# Altium PCB B-60-30-B.PcbDoc (part 3 of 3)
Units mm, origin at the board's own origin, x right, y up, seen from the top; angles counter-clockwise.
Board outline 70.1 x 39.1 mm, 6 copper layers (Top Layer, G1, S1, S2, G2, Bottom Layer), stack 2.011 mm thick; 241 components, 129 nets, 632 pads, 875 vias.
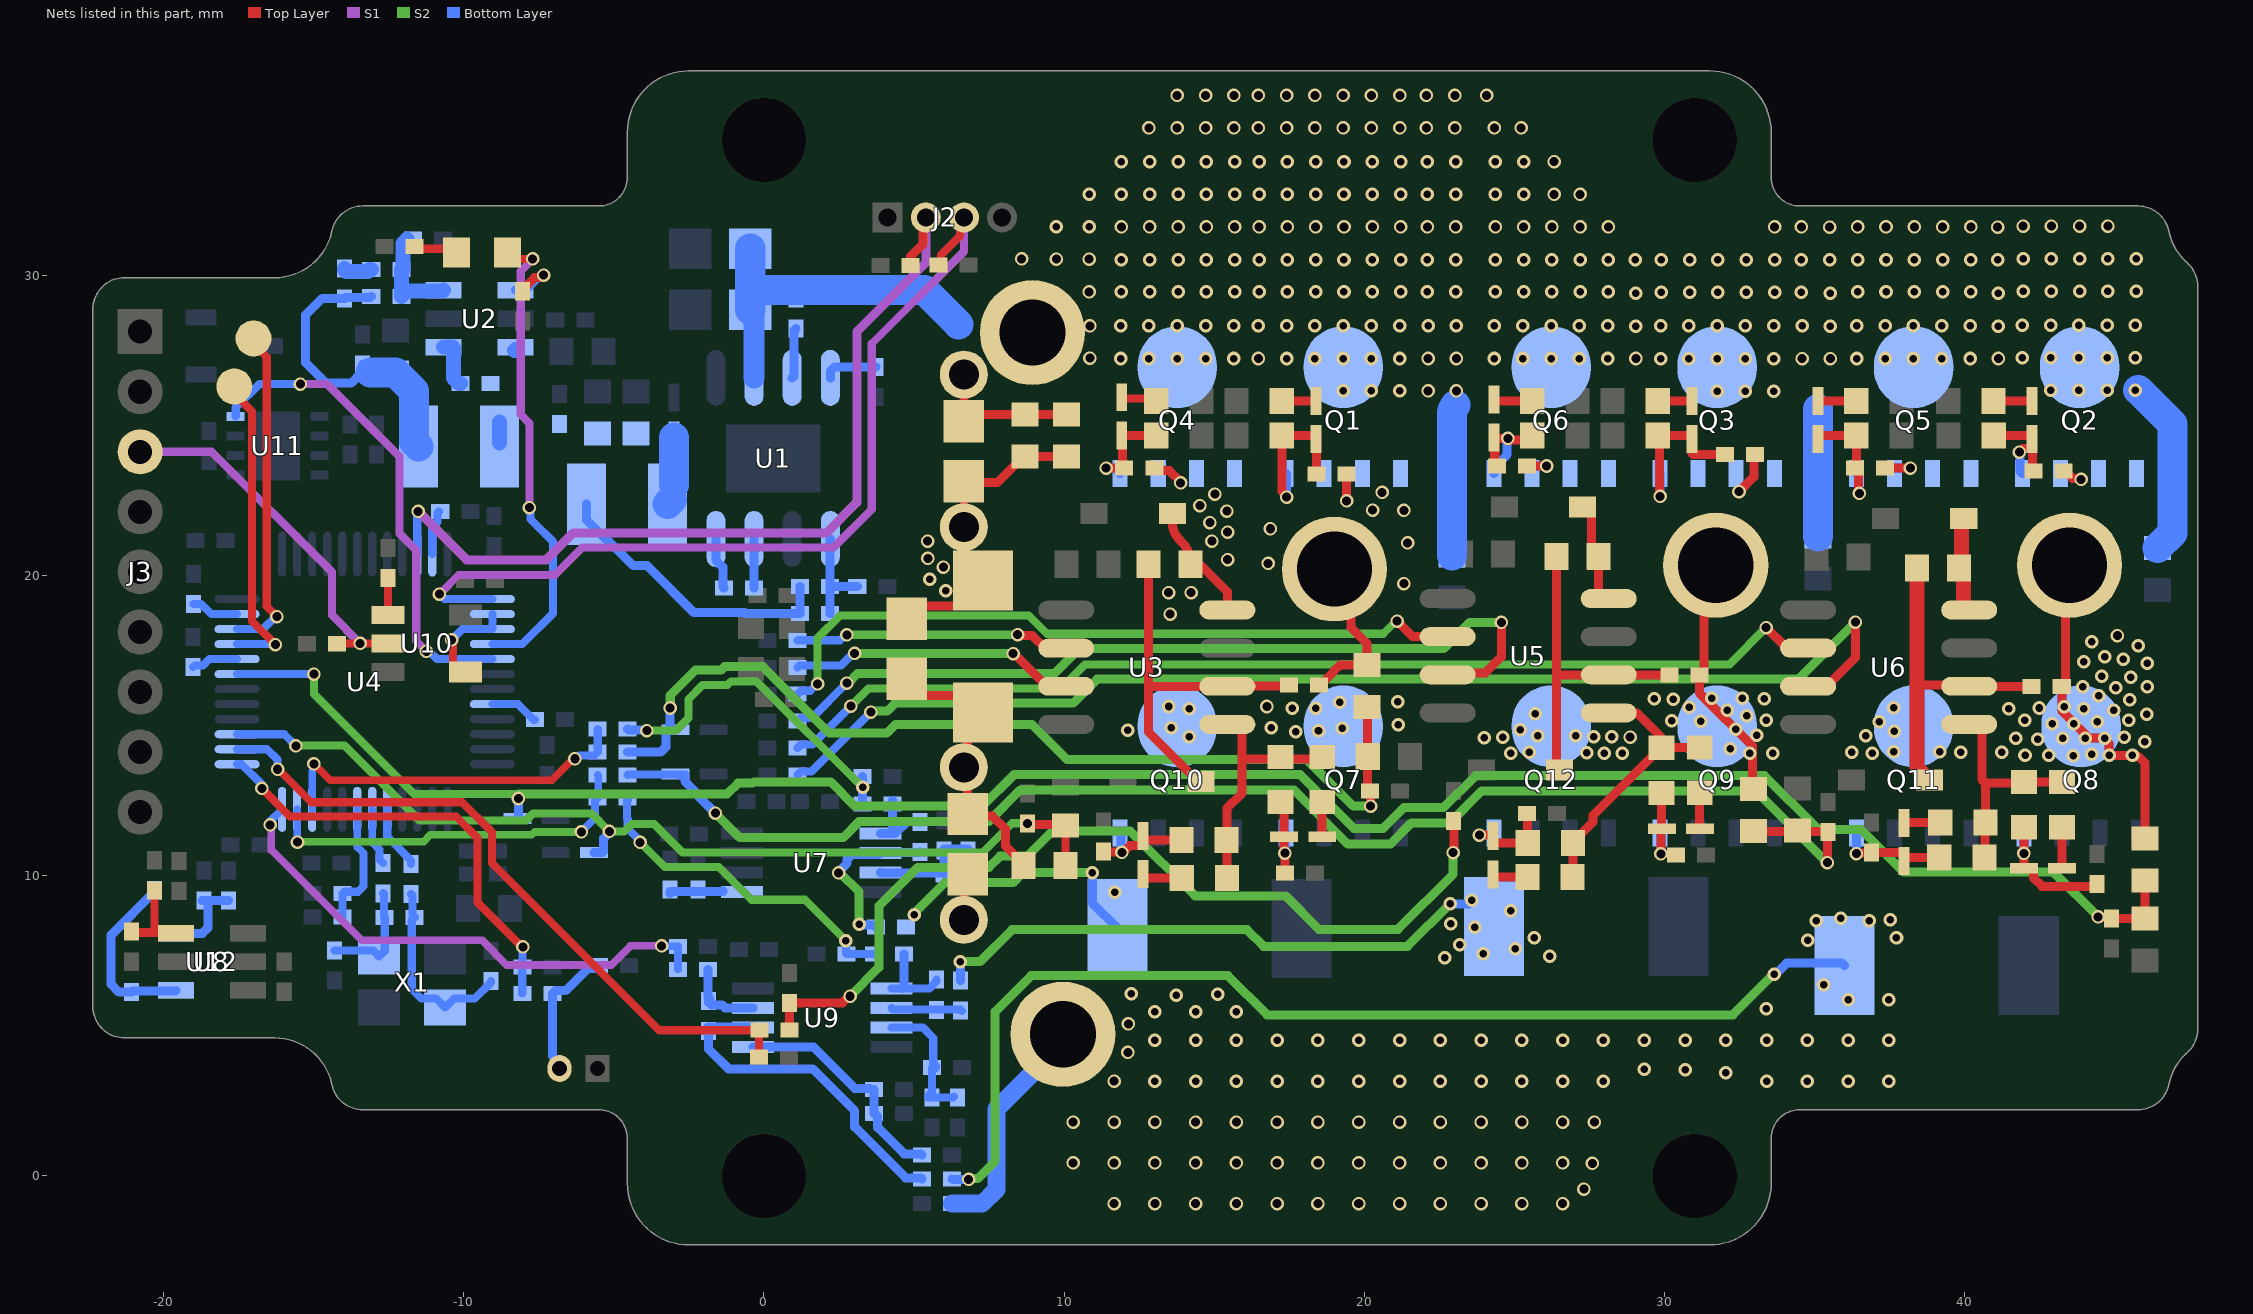
[diagram p6: the nets of this part, all layers, seen from the top]

## Via types
v1: diameter 0.45, hole 0.3, Top Layer to Bottom Layer, 450 vias
v2: diameter 0.45, hole 0.25, Top Layer to Bottom Layer, 425 vias

## Nets (pads, with @x,y where several pads share a name; then routed paths per layer and width w, separated by ;. In a path a pad name is that pad's centre, name@x,y a point inside that pad or via, vN(x,y) a via of type N, cw(c..) or ccw(c..) an arc to the next point about the centre after c; other vN are vias at no path point) (continued)
IA: C50.2 R12.2 R71.2 | length 11.2
  S2 w0.27: v1(-3.9,14.83) -2.929,14.83 -2.514,15.245 -2.514,15.872 -2.041,16.345 -1.22,16.345 -1.101,16.464 -0.244,16.464 3.281,12.939 v2(3.29,12.939)
  Bottom Layer w0.3: R12.2@-4.536,14.874 -4.514,14.852 -3.922,14.852 v1(-3.9,14.83) ; R71.2@3.28,12.5 3.28,12.87 3.29,12.88 v2(3.29,12.939) ; v2@3.285,12.905 C50.2@3.285,13.295
IB: C61.2 R18.2 R90.1 | length 11.2
  S2 w0.27: v1(-4.12,11.106) -3.304,10.29 -1.505,10.29 -0.41,9.195 1.365,9.195 v2(2.73,7.83)
  Bottom Layer w0.27: R18.2@-4.536,12.588 -4.536,12.495 -4.558,12.473 -4.558,11.897 -4.536,11.875 -4.536,11.571 -4.12,11.155 v1(-4.12,11.106) ; v2(2.73,7.83) 2.73,7.404 C61.2@2.753,7.381 R90.1@3.658,7.381
IC: C60.2 R89.2 U4.12 | length 17.7
  S1 w0.254: v1(-16.45,11.69) -16.412,11.653 -16.412,10.853 -13.4,7.84 -9.38,7.84 -8.56,7.02 -5.083,7.02 -4.442,7.661 v1(-3.41,7.661)
  Bottom Layer w0.254: v1(-16.45,11.69) -16.45,11.802 U4.12@-16.045,12.207 ; v1(-3.41,7.661) -3.397,7.648 -2.874,7.648 C60.2@-2.861,7.635 R89.2@-2.861,6.873
LA: R31.1 R37.1 R41.1 R45.1 U3.5 | length 8.3
  Top Layer w0.3: R45.1@15.41,11.191 15.415,11.187 15.415,9.925 R41.1@15.419,9.921 R41.1@15.429,9.911 ; R45.1@15.419,11.36 15.419,12.24 15.927,12.748 15.927,13.882 ; U3.5@15.434,15.034 15.927,15.034 15.927,13.882 ; R31.1@18.594,13.882 17.197,13.882 15.927,13.882
LB: R34.1 R40.1 R44.1 R47.1 U5.5 | length 9.3
  Top Layer w0.3: R44.1@26.933,9.95 26.938,9.955 26.938,11.075 R47.1@26.943,11.08 26.943,11.109 27.61,11.775 27.61,11.997 29.868,14.255 R40.1@29.897,14.255 ; U5.5@28.134,15.415 29.065,15.415 29.897,14.583 R40.1@29.897,14.255 ; R34.1@31.167,14.263 31.163,14.259 29.901,14.259 R40.1@29.897,14.255
LC: R32.1 R38.1 R42.1 R46.1 U6.5 | length 7.1
  Top Layer w0.3: U6.5@40.453,15.034 40.565,14.923 40.565,13.195 40.683,13.077 ; R46.1@40.653,10.6 40.668,10.615 40.668,11.755 R42.1@40.683,11.77 40.683,12.947 40.683,13.077 ; R32.1@43.232,13.112 R38.1@41.962,13.112 41.927,13.077 40.683,13.077
LED: LED1.2 U4.40 | length 15.8
  Top Layer w0.27: LED1.2@-8.535,30.749 -8.326,30.54 v1(-7.7,30.54)
  S1 w0.27: v1(-7.81,22.25) -7.81,25.06 -8.1,25.35 -8.1,30.14 v1(-7.7,30.54)
  Bottom Layer w0.27: U4.40@-9.045,17.707 -8.048,17.707 -7.026,18.729 -7.026,21.124 -7.665,21.763 -7.776,21.874 -7.776,22.216 v1(-7.81,22.25)
NetC1_1: C1.1 D2.2 L2.1 U1.8 | length 3.5
  Bottom Layer w0.3: U1.8@-1.599,21.209 -1.599,20.502 -1.37,20.273 -1.37,19.606 C1.1@-1.337,19.573
  Bottom Layer w1: L2.1@-3.217,22.367 L2.1@-3.067,22.517 ; L2.1@-2.996,23 D2.2@-2.996,24.59
NetC1_2: C1.2 U1.7 | length 1.6
  Bottom Layer w0.3: C1.2@-0.337,19.573 -0.333,19.577 -0.333,21.205 U1.7@-0.329,21.209
NetC6_1: C6.1 C15.1 L1.2 R1.1 R3.1 | length 10.3
  Bottom Layer w0.3: R1.1@-13.37,26.97 R1.1@-13.37,27.02 ; -13.1,26.75 -13.367,26.747 -13.403,26.747 -13.75,26.4 -14.58,26.4 -15.269,27.089 -15.269,28.661 -14.71,29.22 R3.1@-13.97,29.22 -13.936,29.254 -13.112,29.254 C15.1@-13.078,29.288
  Bottom Layer w1: -13.1,26.75 C6.1@-12.267,26.747 -11.65,26.13 -11.65,24.44 L1.2@-11.5,24.29
NetC13_1: C13.1 L1.1 U2.6 | length 0.7
  Bottom Layer w0.5: L1.1@-8.805,24.399 L1.1@-8.805,25.109 ; U2.6@-8.302,27.488 -8.276,27.513 U2.6@-8.273,27.513
NetC13_2: C13.2 U2.1 | length 1.6
  Bottom Layer w0.5: U2.1@-10.67,27.6 -10.37,27.6 -10.345,27.575 -10.345,26.575 -10.16,26.39 C13.2@-10.11,26.39
NetC15_2: C15.2 R7.2 R10.1 U2.3 | length 3.5
  Bottom Layer w0.5: R10.1@-11.881,31.193 -12.028,31.046 -12.028,30.177 R7.2@-12.078,30.177 C15.2@-12.078,29.288 -11.891,29.475 -10.695,29.475 U2.3@-10.67,29.5
NetC16_1: C16.1 C17.1 C18.1 L2.2 R4.2 R8.2 | length 9.8
  Bottom Layer w0.3: L2.2@-5.917,22.367 -5.917,21.854 -5.22,21.157 -5.187,21.157 -4.35,20.32 -3.89,20.32 -2.329,18.759 -0.655,18.759 -0.621,18.725 R8.2@1.203,18.725 C18.1@1.203,19.62
NetC18_2: C18.2 R8.1 R11.2 U1.5 | length 3.4
  Bottom Layer w0.3: R8.1@2.203,18.725 C18.2@2.203,19.62 ; U1.5@2.211,21.209 2.207,21.205 2.207,19.624 C18.2@2.203,19.62 ; R11.2@3.108,19.62 C18.2@2.203,19.62
NetC23_1: C23.1 D3.2 U3.8 | length 4.6
  Top Layer w0.3: D3.2@13.6,22.05 13.6,21.755 ccw(c14.385,21.755) 13.83,21.2 13.897,21.133 cw(c13.133,20.368) C23.1@14.214,20.368 14.512,20.368 15.434,19.446 U3.8@15.434,18.844 U3.8@14.906,18.844
NetC23_2: C23.2 D7.2 R19.2 U3.6 | length 12.5
  Top Layer w0.3: C23.2@12.814,20.368 12.814,16.33 ; D7.2@14.56,13.129 14.46,13.129 12.814,14.775 12.814,16.33 ; R19.2@17.324,16.312 17.32,16.308 15.438,16.308 U3.6@15.434,16.304 12.84,16.304 12.814,16.33
NetC28_1: C28.1 U4.23 | length 1.6
  Bottom Layer w0.27: C28.1@-19,19.05 -18.75,19.05 -18.407,18.707 U4.23@-17.545,18.707
NetC29_1: C29.1 U4.35 | length 1.5
  Bottom Layer w0.27: U4.35@-11.036,20.716 U4.35@-11.045,20.707 -11.045,21.595 -10.87,21.77 -10.87,22.08 C29.1@-10.82,22.13
NetC37_1: C37.1 D11.2 U5.8 | length 3.6
  Top Layer w0.3: D11.2@27.26,22.273 27.36,22.273 27.56,22.073 27.56,20.865 C37.1@27.803,20.622 27.803,19.377 27.955,19.225 U5.8@28.134,19.225
NetC37_2: C37.2 D15.2 R36.2 U5.6 | length 10.9
  Top Layer w0.3: C37.2@26.403,20.622 26.403,16.68 ; D15.2@26.498,13.51 26.403,13.605 26.403,16.68 ; R36.2@30.159,16.685 26.408,16.685 26.403,16.68
NetC38_2: C38.2 R43.2 R48.1 X1.1 | length 6.6
  Bottom Layer w0.27: R43.2@-11.75,9.39 -11.704,9.344 -11.704,8.684 R48.1@-11.63,8.61 -11.73,8.51 -11.73,6.218 -11.412,5.9 -10.913,5.9 X1.1@-10.616,5.603 -10.315,5.904 -9.63,5.904 -9.092,6.442 C38.2@-9.092,6.492
NetC39_2: C39.2 R49.2 U4.7 | length 4.2
  Bottom Layer w0.254: U4.7@-13.545,12.207 -13.545,10.952 -13.33,10.737 -13.33,10.696
  Bottom Layer w0.27: C39.2@-14.042,8.625 R49.2@-14.042,9.398 -13.979,9.46 -13.52,9.46 -13.33,9.65 -13.33,10.696
NetC41_2: C41.2 R48.2 R51.2 X1.3 | length 3.8
  Bottom Layer w0.27: C41.2@-14.299,7.5 -13.013,7.5 X1.3@-12.816,7.303 -12.63,7.489 R48.2@-12.63,8.61 -12.655,8.635 -12.655,9.385 R51.2@-12.68,9.41
NetC42_1: C42.1 D19.2 U6.8 | length 3.6
  Top Layer w0.5: D19.2@39.96,21.892 39.883,21.815 39.883,20.318 C42.1@39.806,20.241 39.956,20.091 39.956,18.904 40.016,18.844 U6.8@40.453,18.844
NetC42_2: C42.2 D20.2 R53.2 U6.6 | length 11.2
  Top Layer w0.3: 38.406,16.304 38.361,16.349 38.406,16.349 40.408,16.349 40.453,16.304 R53.2@42.224,16.304
  Top Layer w0.5: C42.2@38.406,20.241 38.406,16.349 38.406,16.304 38.406,13.594 38.62,13.38 38.62,13.28 38.72,13.18 D20.2@38.82,13.18
NetC48_2: C48.2 R73.2 R76.2 U7.3 | length 3.8
  Bottom Layer w0.3: U7.3@3.876,10.104 3.898,10.082 5.988,10.082 R73.2@6.005,10.065 ; R73.2@6.01,10.06 R73.2@6.005,10.065 ; R76.2@6.8,10.89 6,10.89 6.005,10.885 R73.2@6.005,10.065
NetC54_1: C54.1 R82.1 U8.3 | length 2.9
  Bottom Layer w0.3: U8.3@-19.588,8.077 -18.706,8.077 -18.515,8.268 C54.1@-18.515,9.167 ; C54.1@-18.715,9.167 R82.1@-17.826,9.167
NetC57_2: C57.2 R92.2 R94.2 U9.5 | length 7.6
  Bottom Layer w0.3: U9.5@-0.357,4.288 1.652,4.288 3.03,2.91 R94.2@3.51,2.91 ; R94.2@3.67,2.88 C57.2@3.67,2.08 3.688,2.08 3.788,1.98 3.788,1.612 4.672,0.728 5.232,0.728 R92.2@5.27,0.69
NetC58_2: C58.2 R93.2 R95.2 U9.3 | length 4.5
  Bottom Layer w0.27: U9.3@4.243,4.938 5.292,4.938 5.64,4.59 5.64,3.64 R93.2@5.625,3.625 ; R93.2@5.6,3.6 5.6,2.79 5.47,2.66 5.47,2.61 6.3,2.61 6.31,2.62 R95.2@6.325,2.635 ; R93.2@5.725,3.6 R93.2@5.725,3.655
NetC62_1: C62.1 R91.1 U8.1 | length 6
  Bottom Layer w0.3: R91.1@-20.3,9.51 -20.3,9.46 -21.74,8.02 -21.74,6.38 -21.48,6.12 -21.056,6.12 C62.1@-21.055,6.119 -21.026,6.148 -19.617,6.148 U8.1@-19.588,6.177
NetC66_1: C66.1 R98.1 U12.1 | length 2.9
  Top Layer w0.27: -20.321,8.106 -20.293,8.134 R98.1@-20.293,9.5
  Top Layer w0.3: C66.1@-21.055,8.135 -21.026,8.106 -20.321,8.106 -19.617,8.106 U12.1@-19.588,8.077
NetD4_1: D4.1 Q1.2 R22.2 R105.2 | length 5.3
  Top Layer w0.3: v1(17.41,22.6) 17.41,22.641 17.248,22.803 R22.2@17.248,24.66 18.361,24.66 18.361,24.6 D4.1@18.421,24.54 ; D4.1@18.391,24.533 18.4,24.524 18.4,23.389 R105.2@18.41,23.38
  Bottom Layer w0.3: Q1.2@17.39,23.383 17.41,23.363 v1(17.41,22.6)
NetD4_2: D4.2 R14.2 | length 1.1
  Top Layer w0.3: R14.2@17.248,25.803 D4.2@18.391,25.803
NetD5_1: D5.1 Q2.2 R23.2 R107.1 | length 3.7
  Top Layer w0.3: R23.2@40.959,24.66 42.199,24.66 42.229,24.63 D5.1@42.229,24.533 42.255,24.508 42.255,24.218 42.255,23.506 R107.1@42.28,23.48 ; v1(41.81,24.1) 41.928,24.218 42.199,24.218 D5.1@42.229,24.248
  Bottom Layer w0.3: v1(41.81,24.1) 41.839,24.071 41.839,23.456 Q2.2@41.911,23.383
NetD5_2: D5.2 R15.2 | length 1.3
  Top Layer w0.3: R15.2@40.95,25.803 D5.2@42.229,25.803
NetD6_1: D6.1 Q3.2 R24.2 R106.1 | length 5.2
  Top Layer w0.3: v1(29.85,22.63) 29.821,22.659 29.821,24.609 R24.2@29.77,24.66 30.883,24.66 30.913,24.63 D6.1@30.913,24.533 ; 30.913,24.05 30.943,24.02 R106.1@32.01,24.02
  Bottom Layer w0.3: Q3.2@29.841,23.383 29.85,23.374 v1(29.85,22.63)
NetD6_2: D6.2 R17.2 | length 1.1
  Top Layer w0.3: R17.2@29.77,25.803 D6.2@30.913,25.803
NetD8_1: D8.1 Q4.2 R28.2 R99.1 | length 3.1
  Top Layer w0.3: v1(11.4,23.57) R99.1@12,23.57 11.944,23.626 11.944,24.39 11.944,24.63 D8.1@11.914,24.66 12.49,24.66 R28.2@13.066,24.66
  Bottom Layer w0.3: Q4.2@11.686,23.56 Q4.2@11.863,23.383
NetD8_2: D8.2 R25.2 | length 1.2
  Top Layer w0.27: D8.2@11.914,25.93 11.959,25.885 12.984,25.885 R25.2@13.066,25.803
NetD9_1: D9.1 Q5.2 R29.2 R100.1 | length 4.1
  Top Layer w0.3: D9.1@35.104,24.533 35.104,24.63 35.134,24.66 R29.2@36.383,24.66 ; R29.2@36.381,24.669 36.381,23.57 36.451,23.5 36.451,22.759 v1(36.48,22.73)
  Bottom Layer w0.3: Q5.2@36.384,23.383 36.451,23.316 36.451,22.759 v1(36.48,22.73)
NetD9_2: D9.2 R26.2 | length 1.3
  Top Layer w0.3: D9.2@35.104,25.803 R26.2@36.383,25.803
NetD10_1: D10.1 Q6.2 R30.2 R101.1 | length 3.6
  Top Layer w0.3: D10.1@24.309,24.673 24.309,24.591 D10.1@24.34,24.56 ; D10.1@24.31,24.59 D10.1@24.34,24.56 ; D10.1@24.34,24.47 24.34,23.71 R101.1@24.41,23.64 ; v1@24.78,24.47 24.809,24.499 25.426,24.499 R30.2@25.588,24.66 ; v1(24.78,24.56) D10.1@24.34,24.56
  Bottom Layer w0.3: Q6.2@24.314,23.383 24.314,23.583 24.751,24.02 24.751,24.441 v1@24.78,24.47
NetD10_2: D10.2 R27.2 | length 1.3
  Top Layer w0.3: D10.2@24.309,25.803 R27.2@25.588,25.803
NetD12_1: D12.1 Q7.2 R37.2 R108.1 | length 3.1
  Top Layer w0.3: R37.2@17.197,12.376 17.321,12.251 D12.1@17.321,11.224 ; D12.1@17.324,11.224 D12.1@17.321,11.224 ; R108.1@17.35,10.08 v1(17.35,10.75) 17.321,10.779 D12.1@17.321,11.224
  Bottom Layer w0.3: v1(17.35,10.75) 17.35,11.461 Q7.2@17.39,11.421
NetD12_2: D12.2 R31.2 | length 1.1
  Top Layer w0.3: D12.2@18.594,11.294 R31.2@18.594,12.376
NetD13_1: D13.1 Q8.2 R38.2 R110.1 | length 4.7
  Top Layer w0.3: 41.96,10.464 v1(41.96,10.74) 41.96,11.603 R38.2@41.962,11.605 ; D13.1@41.965,10.245 42.25,10.245 42.28,10.215 42.28,9.93 42.568,9.642 44.312,9.642 R110.1@44.39,9.72
  Bottom Layer w0.3: v1(41.96,10.74) 41.96,11.419 Q8.2@41.962,11.421
NetD13_2: D13.2 R32.2 | length 1.1
  Top Layer w0.3: 43.232,10.462 R32.2@43.232,11.605
NetD14_1: D14.1 Q9.2 R40.2 R109.1 | length 2.8
  Top Layer w0.3: v1(29.87,10.72) 29.87,11.514 D14.1@29.912,11.556 29.897,11.571 R40.2@29.897,12.748
  Bottom Layer w0.3: Q9.2@29.841,11.421 29.869,11.393 v1(29.87,10.72) v1(29.87,10.72)
NetD14_2: D14.2 R34.2 | length 1.2
  Top Layer w0.3: R34.2@31.167,12.757 31.167,11.571 D14.2@31.182,11.556
NetD16_1: D16.1 Q10.2 R45.2 R104.1 | length 3.6
  Top Layer w0.3: R104.1@11.31,10.8 11.325,10.785 11.906,10.785 v1(11.92,10.77) ; v1@11.905,10.765 11.955,10.765 12.194,11.003 12.595,11.003 12.625,11.033 12.625,11.191 R45.2@13.904,11.191
  Bottom Layer w0.3: Q10.2@11.863,11.421 11.892,11.392 11.892,10.799 v1(11.92,10.77)
NetD16_2: D16.2 R41.2 | length 1.4
  Top Layer w0.3: D16.2@12.625,10.208 12.625,10.111 D16.2@12.655,10.081 ; D16.2@12.655,9.921 R41.2@13.912,9.921
NetD17_1: D17.1 Q11.2 R46.2 R102.1 | length 3.7
  Top Layer w0.3: v1(36.38,10.73) 36.4,10.75 36.96,10.75 36.98,10.77 37.94,10.77 37.97,10.74 D17.1@37.97,10.6 ; D17.1@37.97,10.48 D17.1@37.97,10.6 ; R46.2@39.147,10.6 D17.1@37.97,10.6
  Bottom Layer w0.3: v1(36.38,10.73) 36.382,10.732 36.382,11.419 Q11.2@36.384,11.421
NetD17_2: D17.2 R42.2 | length 1.2
  Top Layer w0.3: D17.2@37.97,11.77 R42.2@39.177,11.77
NetD18_1: D18.1 Q12.2 R47.2 R103.1 | length 3.4
  Top Layer w0.3: v1(23.83,11.35) 24.25,11.35 24.28,11.32 24.28,11.21 24.28,11.11 24.31,11.08 R47.2@25.437,11.08 25.423,11.093 25.423,12.047 R103.1@25.41,12.06
  Bottom Layer w0.3: v1(23.83,11.35) 24.214,11.35 24.314,11.45 Q12.2@24.314,11.472
NetD18_2: D18.2 R44.2 | length 1.2
  Top Layer w0.3: D18.2@24.28,9.94 24.29,9.95 R44.2@25.427,9.95
NetLED1_1: LED1.1 R69.1 | length 1.4
  Top Layer w0.27: R69.1@-11.632,30.876 -10.362,30.876 LED1.1@-10.235,30.749
NetR2_2: R2.2 U2.4 | length 2.1
  Top Layer w0.3: R2.2@-8.04,29.46 -8.04,29.51 -7.639,29.911 -7.468,29.911 -7.409,29.97 -7.368,29.97 v1(-7.339,29.999)
  Bottom Layer w0.3: U2.4@-8.27,29.5 -7.945,29.5 -7.534,29.911 -7.468,29.911 -7.409,29.97 -7.368,29.97 v1(-7.339,29.999)
NetR3_2: R3.2 R7.1 | length 1
  Bottom Layer w0.5: R3.2@-13.97,30.22 -13.97,30.17 -13.917,30.117 -13.188,30.117 -13.128,30.177 R7.1@-13.078,30.177
NetR5_2: R5.2 U1.3 | length 1.7
  Bottom Layer w0.3: U1.3@0.941,26.574 1.004,26.637 1.004,28.153 R5.2@1.068,28.217
NetR6_2: R6.2 U1.4 | length 1.8
  Bottom Layer w0.3: U1.4@2.211,26.574 2.211,26.788 2.363,26.94 R6.2@3.74,26.94
NetR12_1: R12.1 R13.1 U4.10 | length 12.4
  Top Layer w0.254: v1(-14.99,13.72) -14.442,13.172 -7.063,13.172 -6.345,13.89 v1(-6.295,13.89)
  Bottom Layer w0.254: U4.10@-15.045,12.207 -15.045,13.475 -15.028,13.493 -15.028,13.683 v1(-14.99,13.72)
  Bottom Layer w0.27: v1(-6.295,13.89) -6.246,13.89 -6.139,13.997 -5.651,13.997 R13.1@-5.536,14.112 R12.1@-5.536,14.874
NetR16_1: R16.1 U3.2 | length 9.2
  Top Layer w0.3: v1(8.446,18.022) 8.475,17.994 8.943,17.994 9.363,17.574 U3.2@10.07,17.574
  S2 w0.27: v1(2.764,18.016) 2.767,18.019 8.443,18.019 v1(8.446,18.022)
  Bottom Layer w0.27: R16.1@1.123,17.83 1.128,17.835 2.535,17.835 2.715,18.016 v1(2.764,18.016)
NetR18_1: R18.1 R21.1 U4.11 | length 12.8
  S2 w0.254: v1(-15.535,11.115) -15.519,11.131 -11.336,11.131 -11.109,11.358 -7.73,11.358 -7.637,11.451 v1(-6.08,11.451)
  Bottom Layer w0.254: U4.11@-15.545,12.207 -15.542,12.204 -15.542,11.123 v1(-15.535,11.115) ; v1(-6.08,11.451) -5.627,11.904 -5.627,12.497 R18.1@-5.536,12.588 ; R21.1@-5.536,13.35 -5.523,13.337 R18.1@-5.523,12.588
NetR20_1: R20.1 U3.3 | length 9.6
  Top Layer w0.3: v1(8.3,17.389) 8.334,17.389 9.418,16.304 U3.3@10.07,16.304
  S2 w0.3: v1(3.02,17.4) 3.026,17.394 8.294,17.394 v1(8.3,17.389)
  Bottom Layer w0.27: R20.1@1.123,16.935 1.182,16.994 2.565,16.994 2.971,17.4 v1(3.02,17.4)
NetR33_1: R33.1 U4.20 | length 1.6
  Bottom Layer w0.27: R33.1@-19.01,16.94 -18.95,17 -18.68,17 -18.473,17.207 U4.20@-17.545,17.207
NetR35_1: R35.1 U5.2 | length 24.3
  Top Layer w0.3: v1(21.09,18.47) 21.605,17.955 U5.2@22.77,17.955
  S2 w0.27: v1(1.79,16.38) 1.79,17.91 2.54,18.66 8.82,18.66 9.426,18.054 20.625,18.054 21.041,18.47 v1(21.09,18.47)
  Bottom Layer w0.27: R35.1@1.123,16.041 1.238,16.156 1.542,16.156 1.766,16.38 v1(1.79,16.38)
NetR39_1: R39.1 U5.3 | length 28
  Top Layer w0.3: U5.3@22.77,16.685 22.833,16.748 24.028,16.748 24.56,17.28 v1(24.56,18.43)
  S2 w0.3: v1(2.76,16.41) 2.801,16.41 3.121,16.73 9.68,16.73 10.509,17.559 22.639,17.559 23.51,18.43 v1(24.56,18.43)
  Bottom Layer w0.27: R39.1@1.123,15.146 1.228,15.251 1.601,15.251 v1(2.76,16.41)
NetR50_1: R50.1 U4.44 | length 1.6
  Bottom Layer w0.27: U4.44@-9.045,15.707 -8.187,15.707 -7.67,15.19 R50.1@-7.62,15.19
NetR52_1: R52.1 U6.2 | length 36
  Top Layer w0.3: v1@33.38,18.305 v1(33.38,18.26) 34.04,17.6 35.063,17.6 U6.2@35.089,17.574
  S2 w0.27: v1(2.895,15.645) 3.485,16.235 9.895,16.235 10.695,17.035 32.155,17.035 v1(33.38,18.26)
  Bottom Layer w0.27: R52.1@1.123,14.251 1.238,14.366 1.616,14.366 v1(2.895,15.645)
NetR54_1: R54.1 U6.3 | length 40.5
  Top Layer w0.3: U6.3@34.778,16.305 35.395,16.305 36.35,17.26 v1(36.35,18.44)
  S2 w0.3: v1(3.564,15.446) 3.593,15.475 4.103,15.475 4.369,15.74 10.3,15.74 11.1,16.54 34.45,16.54 v1(36.35,18.44)
  Bottom Layer w0.27: R54.1@1.123,13.356 1.238,13.471 1.589,13.471 v1(3.564,15.446)
NetR62_2: R62.2 R66.1 Rt1.2 | length 30.4
  Top Layer w0.3: R66.1@0.846,4.849 0.848,4.851 0.848,5.758 R62.2@0.85,5.76 2.609,5.76 2.829,5.98 v1(2.87,5.98) ; v1(22.95,10.76) 22.975,10.785 Rt1.2@22.975,11.735
  S2 w0.3: v1(2.87,5.98) 3.83,6.94 3.83,8.98 5.125,10.275 7.495,10.275 7.87,10.65 8.77,10.65 9.6,11.48 12.2,11.48 14.361,9.319 17.371,9.319 18.48,8.21 21.11,8.21 22.95,10.05 v1(22.95,10.76)
NetR68_1: R68.1 R70.2 U7.2 | length 5.7
  S2 w0.3: v1(2.49,10.092) 2.531,10.092 3.17,9.453 v2(3.17,8.38)
  Bottom Layer w0.3: v1(2.49,10.092) 2.49,10.133 2.773,10.416 2.773,10.543 2.932,10.701 3.823,10.701 3.889,10.767 5.187,10.767 R68.1@5.2,10.78 ; v2(3.17,8.38) 3.199,8.351 3.659,8.351 R70.2@3.73,8.28
NetR68_2: R68.2 R71.1 U7.1 | length 2.6
  Bottom Layer w0.3: U7.1@3.876,11.404 U7.1@4.227,11.404 ; R71.1@4.28,12.5 4.28,11.457 U7.1@4.227,11.404 ; R68.2@5.2,11.78 5.18,11.8 4.767,11.8 4.371,11.404 U7.1@4.227,11.404
NetR72_2: R72.2 R77.1 U7.5 | length 1.8
  Bottom Layer w0.3: R77.1@-3.13,9.47 -2.2,9.47 -1.37,9.47 U7.5@-1.36,9.48 ; R77.1@-3.127,9.397 R77.1@-3.127,9.403
NetR81_1: R81.1 R86.2 U9.2 | length 2.4
  Bottom Layer w0.27: U9.2@4.243,5.588 4.292,5.539 5.75,5.539 6.541,5.539 R86.2@6.59,5.49
NetR81_2: R81.2 R90.2 U9.1 | length 2.8
  Bottom Layer w0.27: U9.1@4.243,6.238 4.605,6.238 5.508,6.238 5.75,6.48 R81.2@5.75,6.53
  Bottom Layer w0.3: U9.1@4.605,6.238 4.658,6.291 R90.2@4.658,7.381
NetR83_1: R83.1 R85.2 U9.6 | length 11.3
  Bottom Layer w0.3: R83.1@-1.857,4.957 -0.376,4.957 U9.6@-0.357,4.938 ; R83.1@-1.85,4.82 -1.85,4.23 -1.18,3.56 1.62,3.56 3.02,2.16 3.02,1.63 4.717,-0.067 5.237,-0.067 R85.2@5.27,-0.1
NetR83_2: R83.2 R89.1 U9.7 | length 2.7
  Bottom Layer w0.3: R89.1@-1.861,6.873 -1.857,6.869 -1.857,5.972 -1.853,5.968 -1.853,5.918 R83.2@-1.802,5.868 ; R83.2@-1.85,5.77 R83.2@-1.85,5.82 -1.85,5.792 -1.75,5.692 -1.392,5.692 -1.291,5.591 -0.36,5.591 U9.7@-0.357,5.588
NetR84_1: R84.1 U10.1 | length 1.2
  Top Layer w0.27: U10.1@-12.528,18.682 -12.52,18.69 R84.1@-12.52,19.91
OSCIN: R43.1 U4.5 | length 2.1
  Bottom Layer w0.27: U4.5@-12.545,12.207 -12.545,11.299 -11.75,10.504 R43.1@-11.75,10.39
OSCOUT: R51.1 U4.6 | length 1.9
  Bottom Layer w0.254: U4.6@-13.045,12.207 -13.045,11.108 -12.803,10.866 -12.803,10.533 R51.1@-12.68,10.41
OUTA: A.1 Q1.3 Q4.3 Q7.1 Q10.1 R19.1 R61.2 R99.2 R105.1 | length 7.6
  Top Layer w0.3: R99.2@13,23.57 13.08,23.49 13.506,23.49 13.877,23.118 v1(13.877,23.078) ; R19.1@18.49,16.35 18.54,16.35 18.968,16.778 18.968,16.798 19.18,17.01 20.03,17.01 R61.2@20.08,17.01 20.08,17.73 19.557,18.253 19.557,19.651 A.1@19,20.208 ; v1(19.41,22.48) R105.1@19.41,23.38 ; v1@20.561,22.79 v1(20.59,22.761)
  other v1: 16.75,15.63 13.53,18.71 13.48,19.42 14.23,19.42 21.31,19.72 16.79,20.4 15.44,20.52 21.44,21.08 14.92,21.14 15.44,21.44 16.87,21.55 14.85,21.75 15.42,22.14 20.27,22.17 21.31,22.16 14.52,22.32 15.02,22.7
  other v2: 14.17,14.62 17.72,14.79 18.47,14.82 12.11,14.84 19.26,14.9 13.56,14.92 16.89,14.93 21.12,15.03 14.17,15.55 17.59,15.57 18.38,15.57 13.48,15.63 19.17,15.77 21.11,15.79
OUTB: B.1 Q3.3 Q6.3 Q9.1 Q12.1 R36.1 R74.2 R101.2 R106.2 | length 10.6
  Top Layer w0.3: R101.2@25.41,23.64 v1(26.07,23.64) ; B.1@31.7,20.335 31.309,19.944 31.309,16.785 31.209,16.685 R36.1@31.159,16.685 31.159,16.078 32.93,14.307 32.93,12.91 R74.2@32.95,12.89 ; v1(32.475,22.783) 32.971,23.279 32.971,23.981 R106.2@33.01,24.02
  other v1: 28.85,14.61
  other v2: 24.88,14.07 27.98,14.07 28.58,14.07 27.4,14.09 32.83,14.08 33.6,14.08 25.49,14.1 32.19,14.23 23.99,14.59 24.6,14.61 27.64,14.63 28.23,14.62 25.77,14.65 27.04,14.66 33.06,14.68 25.19,14.85 32.36,14.88 31.2,15.14 30.23,15.16 33.38,15.18 32.73,15.33 25.69,15.39 32.08,15.51 30.82,15.61 30.29,15.87 29.65,15.89 31.56,15.9 33.31,15.89 32.58,15.91
OUTC: C.1 Q2.3 Q5.3 Q8.1 Q11.1 R53.1 R75.2 R100.2 R107.2 | length 12.8
  Top Layer w0.3: R100.2@37.33,23.58 38.172,23.58 v1(38.185,23.567) ; R107.2@43.28,23.48 43.33,23.48 43.586,23.224 43.839,23.224 v1(43.868,23.195) ; C.1@43.486,20.335 43.355,20.204 43.355,16.404 43.255,16.304 R53.1@43.224,16.304 43.224,15.486 43.64,15.07 v2@44.065,14.645 ; v2(44,14.58) 44.66,14.58 44.66,14.529 44.79,14.4 44.79,14.02 v2(44.81,14) 45.511,14 45.531,13.98 v2@45.56,13.98 ; v2(45.58,14) 45.609,13.971 45.768,13.971 45.99,13.749 R75.2@45.99,11.237
  other v1: 45.08,17.99
  other v2: 43.61,13.99 42,14.01 42.79,14.01 44.23,14.04 36.92,14.07 36.23,14.1 37.63,14.12 39.16,14.12 39.86,14.11 41.22,14.1 45.99,14.45 42.43,14.54 41.69,14.57 43.26,14.57 44.66,14.57 45.3,14.6 36.69,14.65 37.65,14.8 42.9,15.05 43.62,15.05 37.15,15.13 44.41,15.13 41.99,15.18 45.46,15.18 46.06,15.38 44.96,15.51 41.46,15.55 43.96,15.55 37.63,15.59 42.47,15.58 43.3,15.62 45.49,15.85 44.46,15.98 45.03,16.25 43.92,16.28 46.07,16.28 45.52,16.61 44.55,16.64 46.07,17.07 43.95,17.12 45.28,17.2 44.66,17.29 45.772,17.646 44.23,17.78
PG: C4.2 C5.2 C7.1 C8.1 C9.1 C10.2 C11.2 D26.1 R9.2 R70.1 R85.1 R86.1 Rs1.2 Rs2.2 Rs3.2 V-.1 | length 83.3
  Top Layer w0.3: C8.1@4.751,18.557 5.171,18.977 6.441,18.977 D26.1@7.291,19.827 6.656,20.462 C5.2@6.656,21.605 C9.1@6.656,23.129 6.7,23.085 7.77,23.085 8.638,23.953 C10.2@8.688,23.953 C11.2@10.085,23.953 ; C4.2@6.656,8.524 6.656,9.921 C7.1@6.783,10.048
  S2 w0.3: v2(5,8.69) 5,8.731 5.075,8.806 5.075,8.815 6.025,9.765 8.295,9.765 8.624,10.094 v2(10.935,10.094) ; v2(6.54,7.13) 7.196,7.13 8.266,8.2 16.084,8.2 16.646,7.638 21.428,7.638 v2(22.85,9.06) ; v1(6.82,-0.12) 6.849,-0.091 7.119,-0.091 7.7,0.49 7.7,5.47 8.9,6.67 15.45,6.67 16.76,5.36 32.27,5.36 v2@33.62,6.71 ; v2@23.539,9.17 v2(23.58,9.17) ; v2@35.249,6.36 v2(35.29,6.36)
  Bottom Layer w0.3: R85.1@6.27,-0.1 6.29,-0.12 v1(6.82,-0.12) ; R86.1@6.54,6.51 v2(6.54,7.13) ; v2(10.935,10.094) 10.935,9.082 Rs1.2@11.777,8.24 ; v2(22.85,9.06) 23.47,9.06 v2(23.58,9.17) ; v2(33.65,6.71) 33.691,6.71 34.061,7.08 35.913,7.08 Rs2.2@35.993,7
  Bottom Layer w0.6: R9.2@6.27,-0.93 7.27,-0.93 7.75,-0.45 7.75,2.23 V-.1@9.43,3.91
  other v1: 11.66,-0.925 13.018,-0.925 14.377,-0.925 15.735,-0.925 17.094,-0.925 18.452,-0.925 19.811,-0.925 21.169,-0.925 22.527,-0.925 23.886,-0.925 25.244,-0.925 26.603,-0.925 27.31,-0.44 10.302,0.433 11.66,0.433 13.018,0.433 14.377,0.433 15.735,0.433 17.094,0.433 18.452,0.433 19.811,0.433 21.169,0.433 22.527,0.433 23.886,0.433 25.244,0.433 26.603,0.433 27.59,0.41 10.302,1.792 11.66,1.792 13.018,1.792 14.377,1.792 15.735,1.792 17.094,1.792 18.452,1.792 19.811,1.792 21.169,1.792 22.527,1.792 23.886,1.792 25.244,1.792 26.603,1.792 27.66,1.79 11.66,3.15 12.12,4.11 12.14,5.06 5.98,20.27 5.46,20.56 5.45,21.14
  other v2: 13.018,3.15 14.377,3.15 15.735,3.15 17.094,3.15 18.452,3.15 19.811,3.15 21.169,3.15 22.527,3.15 23.886,3.15 25.244,3.15 26.603,3.15 27.961,3.15 33.395,3.15 34.753,3.15 36.112,3.15 37.47,3.15 32.04,3.44 29.32,3.55 30.68,3.54 13.018,4.508 14.377,4.508 15.735,4.508 17.094,4.508 18.452,4.508 19.811,4.508 21.169,4.508 22.527,4.508 23.886,4.508 25.244,4.508 26.603,4.508 27.961,4.508 29.319,4.508 30.678,4.508 32.036,4.508 33.395,4.508 34.753,4.508 36.112,4.508 37.47,4.508 13.018,5.471 14.377,5.471 15.735,5.471 33.39,5.57 36.112,5.867 37.47,5.867 13.74,6.01 12.24,6.07 15.12,6.05 22.68,7.27 26.17,7.31 23.96,7.39 25.02,7.57 23.17,7.7 34.77,7.849 25.65,7.93 37.72,7.93 23.68,8.27 22.87,8.39 35.04,8.49 36.81,8.5 37.51,8.52 35.86,8.57 24.88,8.83 11.69,9.438 6.06,19.48 5.53,19.86
PWM: U4.38 U4.39 U10.4 | length 3.6
  Top Layer w0.27: v1(-10.4,17.85) -10.4,17.801 -10.355,17.756 -10.355,16.995 -10.14,16.78 U10.4@-9.94,16.78 ; U10.4@-9.94,16.63 U10.4@-9.74,16.63
  Bottom Layer w0.27: v1(-10.4,17.85) -10.043,18.207 U4.39@-9.045,18.207 U4.38@-9.045,18.707
PWM-IN: J3.3 R88.1 U10.2 | length 12.7
  Top Layer w0.27: J3.3@-20.776,24.113 J3.3@-20.593,24.113 ; R88.1@-14.22,17.732 v1(-13.45,17.732) U10.2@-12.528,17.732 U10.2@-12.516,17.744
  S1 w0.27: J3.3@-20.776,24.113 -18.393,24.113 -14.39,20.11 -14.39,18.672 v1(-13.45,17.732)
RX3: T2.1 U4.22 | length 11.1
  Top Layer w0.27: T2.1@-17,27.89 -17,27.707 -16.56,27.267 -16.56,18.96 v1(-16.22,18.62)
  Bottom Layer w0.27: U4.22@-17.545,18.207 -16.682,18.207 -16.269,18.62 v1(-16.22,18.62)
STB: U4.41 U11.8 | length 16.2
  S1 w0.27: v1(-15.44,26.37) -14.552,26.37 -12.136,23.954 -12.136,21.386 -11.58,20.83 -11.58,17.81 v1(-11.24,17.47)
  Bottom Layer w0.27: U11.8@-17.601,25.288 -17.59,25.299 -17.59,25.58 -16.8,26.37 v1(-15.44,26.37) ; v1(-11.24,17.47) -11.15,17.47 -10.887,17.207 U4.41@-9.045,17.207
SWC: J2.3 R59.1 U4.37 | length 30.4
  Top Layer w0.27: R59.1@5.73,30.33 5.78,30.33 5.895,30.445 5.895,30.665 6.535,31.305 6.535,31.795 J2.3@6.66,31.92
  S1 w0.27: v1(-10.81,19.37) -10.164,20.016 -6.954,20.016 -6.05,20.92 2.32,20.92 3.59,22.19 3.59,27.71 6.66,30.78 J2.3@6.66,31.92
  Bottom Layer w0.27: v1(-10.81,19.37) -10.647,19.207 U4.37@-9.045,19.207
SWD: J2.2 R55.1 U4.34 | length 29.8
  Top Layer w0.3: R55.1@4.88,30.32 4.88,30.616 5.29,31.026 5.29,31.82 J2.2@5.39,31.92
  S1 w0.3: v1(-11.52,22.13) -9.901,20.511 -7.249,20.511 -6.345,21.415 2.085,21.415 3.095,22.425 3.095,28.115 5.39,30.41 J2.2@5.39,31.92
  Bottom Layer w0.27: U4.34@-11.545,20.707 -11.545,22.105 v1(-11.52,22.13)
Temp-M: J4.2 R63.2 R67.1 | length 4.5
  Bottom Layer w0.3: J4.2@-6.806,3.571 -6.806,3.756 -7.048,3.998 R67.1@-7.048,6.067 -6.948,6.167 -6.601,6.167 -5.858,6.91 -5.59,6.91 R63.2@-5.49,7.01
Temp-MOS: C46.2 R66.2 U4.14 | length 22.9
  Top Layer w0.27: v1(-16.2,13.54) -16.177,13.54 -15.077,12.44 -10.05,12.44 -9.06,11.45 -9.06,10.41 -3.499,4.849 -0.162,4.849 -0.158,4.845 -0.158,3.964 C46.2@-0.162,3.96
  Bottom Layer w0.27: U4.14@-17.545,14.207 -16.548,14.207 -16.2,13.859 v1(-16.2,13.54)
Temp-Motor: C47.2 R67.2 U4.13 | length 14.9
  Top Layer w0.27: v1(-16.72,12.9) -15.78,11.96 -10.249,11.96 -9.54,11.251 -9.54,9.103 -8.063,7.626 v1(-8.03,7.626)
  Bottom Layer w0.27: U4.13@-17.545,13.707 -17.397,13.707 -16.72,13.03 v1(-16.72,12.9) ; R67.2@-8.048,6.067 C47.2@-8.048,6.956 ; C47.2@-8.039,6.956 -8.039,7.617 v1(-8.03,7.626)
TX3: T1.1 U4.21 | length 10.4
  Top Layer w0.27: T1.1@-17.64,26.29 -17.64,26.049 -17.05,25.459 -17.05,18.47 v1(-16.27,17.69)
  Bottom Layer w0.27: U4.21@-17.545,17.707 -16.287,17.707 v1(-16.27,17.69)
V+: C4.1 C5.1 C7.2 C8.2 C9.2 C10.1 C11.1 C12.2 C14.2 C30.1 C32.1 C34.1 D26.2 Q1.1 Q2.1 Q3.1 Q4.1 Q5.1 Q6.1 R5.1 R60.2 U1.2 V+.1 | length 42.5
  Top Layer w0.3: C8.2@4.578,16.73 C8.2@4.751,16.557 4.751,16.527 5.276,16.002 6.716,16.002 D26.2@7.291,15.427 6.783,14.919 C7.2@6.783,12.048 ; C5.1@6.656,26.685 C9.2@6.656,25.129 6.88,25.353 C10.1@8.688,25.353 C11.1@10.085,25.353 ; C7.2@7.308,11.493 6.783,12.018 C7.2@6.783,12.048 ; R60.2@8.646,10.335 8.646,10.385 8.05,10.981 8.05,11.54 7.61,11.98 6.851,11.98 C7.2@6.783,12.048 ; R60.2@8.766,10.635 R60.2@8.816,10.635
  Bottom Layer w0.7: C14.2@-0.456,28.844 -0.329,28.717 U1.2@-0.329,26.574 ; C14.2@-0.456,29.37 C14.2@-0.303,29.217
  Bottom Layer w1: C14.2@-0.456,28.844 -0.456,29.37 C12.2@-0.456,30.876 ; C14.2@-0.06,29.5 5.34,29.5 6.48,28.36 ; C30.1@22.912,20.654 22.912,25.362 cw(c23.346,25.362) 23.039,25.669 ; C34.1@35.104,21.289 35.104,25.542 ; v2@45.772,26.177 46.915,25.034 46.915,21.416 C32.1@46.407,20.908
  other v1: 22.12,26.14 23.062,26.14 10.854,27.23 16.465,27.22 22.12,27.22 23.062,27.22 29.044,27.22 34.575,27.216 35.518,27.216 41.114,27.22 10.854,28.31 10.827,29.437 9.737,30.527 10.827,30.527 8.58,30.54 35.491,31.593 41.087,31.597 11.907,31.607 12.849,31.607 13.792,31.607 14.734,31.607 15.677,31.607 16.492,31.607 17.434,31.607 18.377,31.607 19.319,31.607 20.262,31.607 21.204,31.607 22.093,31.607 23.035,31.607 24.358,31.607 25.301,31.607 26.243,31.607 27.186,31.607 28.128,31.607 33.66,31.603 34.548,31.603 36.428,31.607 37.371,31.607 38.313,31.607 39.256,31.607 40.198,31.607 41.935,31.627 42.878,31.627 43.82,31.627 44.763,31.627 26.32,32.69 27.186,32.687 26.32,33.78 25.22,34.9 12.822,34.904 13.765,34.904 14.707,34.904 15.65,34.904 16.465,34.904 17.407,34.904 18.35,34.904 19.292,34.904 20.235,34.904 21.177,34.904 22.066,34.904 23.008,34.904 24.331,34.904 13.765,35.984 14.707,35.984 15.65,35.984 16.465,35.984 17.407,35.984 18.35,35.984 19.292,35.984 20.235,35.984 21.177,35.984 22.066,35.984 23.008,35.984 24.07,35.98
  other v2: 31.748,26.136 32.69,26.136 33.633,26.136 19.292,26.14 20.235,26.14 21.177,26.14 42.851,26.16 43.793,26.16 44.736,26.16 45.678,26.16 11.88,27.22 12.822,27.22 13.765,27.22 14.707,27.22 15.65,27.22 17.407,27.22 18.35,27.22 19.292,27.22 20.235,27.22 21.177,27.22 24.331,27.22 25.274,27.22 26.216,27.22 27.159,27.22 28.101,27.22 29.863,27.216 30.805,27.216 31.748,27.216 32.69,27.216 33.633,27.216 36.401,27.22 37.344,27.22 38.286,27.22 39.229,27.22 40.171,27.22 41.908,27.24 42.851,27.24 43.793,27.24 44.736,27.24 45.678,27.24 35.518,28.296 11.88,28.31 12.822,28.31 13.765,28.31 14.707,28.31 15.65,28.31 16.465,28.31 17.407,28.31 18.35,28.31 19.292,28.31 20.235,28.31 21.177,28.31 22.12,28.31 23.062,28.31 24.331,28.31 25.274,28.31 26.216,28.31 27.159,28.31 28.101,28.31 29.044,28.3 29.863,28.306 30.805,28.306 31.748,28.306 32.69,28.306 33.633,28.306 34.575,28.306 36.401,28.31 37.344,28.31 38.286,28.31 39.229,28.31 40.171,28.31 41.114,28.3 41.908,28.33 42.851,28.33 43.793,28.33 44.736,28.33 45.678,28.33 35.518,29.386 29.044,29.39 41.114,29.39 11.907,29.437 12.849,29.437 13.792,29.437 14.734,29.437 15.677,29.437 16.492,29.437 17.434,29.437 18.377,29.437 19.319,29.437 20.262,29.437 21.204,29.437 22.093,29.437 23.035,29.437 24.358,29.437 25.301,29.437 26.243,29.437 27.186,29.437 28.128,29.437 29.89,29.433 30.832,29.433 31.775,29.433 32.717,29.433 33.66,29.433 34.548,29.433 36.428,29.437 37.371,29.437 38.313,29.437 39.256,29.437 40.198,29.437 41.935,29.457 42.878,29.457 43.82,29.457 44.763,29.457 45.705,29.457 11.907,30.517 12.849,30.517 13.792,30.517 14.734,30.517 15.677,30.517 16.492,30.517 17.434,30.517 18.377,30.517 19.319,30.517 20.262,30.517 21.204,30.517 22.093,30.517 23.035,30.517 24.358,30.517 25.301,30.517 26.243,30.517 27.186,30.517 28.128,30.517 29.017,30.517 29.89,30.513 30.832,30.513 31.775,30.513 32.717,30.513 33.66,30.513 34.548,30.513 35.491,30.513 36.428,30.517 37.371,30.517 38.313,30.517 39.256,30.517 40.198,30.517 41.087,30.517 41.935,30.537 42.878,30.537 43.82,30.537 44.763,30.537 45.705,30.537 9.737,31.607 10.827,31.607 10.827,32.687 11.907,32.687 12.849,32.687 13.792,32.687 14.734,32.687 15.677,32.687 16.492,32.687 17.434,32.687 18.377,32.687 19.319,32.687 20.262,32.687 21.204,32.687 22.093,32.687 23.035,32.687 24.358,32.687 25.301,32.687 11.907,33.777 12.849,33.777 13.792,33.777 14.734,33.777 15.677,33.777 16.492,33.777 17.434,33.777 18.377,33.777 19.319,33.777 20.262,33.777 21.204,33.777 22.093,33.777 23.035,33.777 24.358,33.777 25.301,33.777
V-A: C44.2 D22.1 R13.2 R61.1 R65.2 | length 32.5
  Top Layer w0.3: R61.1@20.08,15.61 20.11,15.58 R65.2@20.11,13.97 20.11,12.92 20.205,12.825 20.2,12.82 20.2,12.321 v1(20.21,12.311)
  S2 w0.3: v1(-3.128,15.58) -3.12,15.588 -3.12,16 -2.28,16.84 -1.425,16.84 -1.306,16.959 -0.039,16.959 2.18,14.74 4.09,14.74 4.38,15.03 8.93,15.03 10.09,13.87 18.07,13.87 19.629,12.311 v1(20.21,12.311)
  Bottom Layer w0.3: R13.2@-4.536,14.112 -3.438,14.112 -3.262,14.289 -3.262,14.825 -3.232,14.855 D22.1@-3.03,14.855 ; v1(-3.128,15.58) -3.128,14.885 -3.098,14.855 D22.1@-3.09,14.855
V-B: C52.2 D23.1 R21.2 R74.1 R78.2 | length 47.5
  Top Layer w0.3: R74.1@32.95,11.49 32.97,11.47 35.42,11.47 C52.2@35.44,11.45 35.46,11.43 35.42,11.39 v1(35.42,10.43)
  S2 w0.3: v1(-1.62,12.081) -0.804,11.265 2.635,11.265 3.17,11.8 7.49,11.8 8.54,12.85 17.648,12.85 19.448,11.05 20.867,11.05 21.567,11.75 22.841,11.75 23.911,12.82 33.03,12.82 v1(35.42,10.43)
  Bottom Layer w0.27: R21.2@-4.536,13.35 -4.521,13.365 D23.1@-2.965,13.365
  Bottom Layer w0.3: D23.1@-2.826,13.35 -2.635,13.35 -2.635,13.145 -2.18,12.69 -2.18,12.643 v1(-1.62,12.081) v1(-1.62,12.081)
V-BUS: C43.2 D21.1 R60.1 R64.2 U4.15 | length 32.3
  Top Layer w0.27: R64.2@10.046,11.667 10.046,10.584 R60.1@10.05,10.58
  Top Layer w0.3: R64.2@10.046,11.667 10.009,11.703 C43.2@8.813,11.703 ; C43.2@8.813,11.703 v1(8.776,11.74) C43.2@8.813,11.703
  S2 w0.27: v1(-15.59,14.32) -15.576,14.334 -13.974,14.334 -11.47,11.83 -7.926,11.83 -7.691,12.065 -5.745,12.065 v1(-5.15,11.47) -4.652,11.47 -4.402,11.72 -3.66,11.72 -2.71,10.77 7.289,10.77 8.26,11.74 v1(8.776,11.74)
  Bottom Layer w0.27: U4.15@-17.545,14.707 -15.977,14.707 v1(-15.59,14.32)
  Bottom Layer w0.3: D21.1@-5.655,10.772 -5.37,10.772 -5.348,10.794 -5.348,11.231 -5.15,11.429 v1(-5.15,11.47)
V-C: C53.2 D24.1 R75.1 R79.2 U4.19 | length 72.1
  Top Layer w0.3: v1(44.439,8.62) 44.464,8.595 44.855,8.595 C53.2@44.88,8.57 ; C53.2@44.88,8.57 R79.2@45.99,8.57 R75.1@45.99,9.837
  S2 w0.27: v1(-14.99,16.71) -14.99,16.05 -11.65,12.71 v1@-8.18,12.71
  S2 w0.3: v1(-8.18,12.566) -8.18,12.71 -1.232,12.71 -0.862,13.08 -0.378,13.08 -0.338,13.12 2.219,13.12 3.029,12.31 7.279,12.31 8.329,13.36 17.859,13.36 19.659,11.56 20.614,11.56 21.314,12.26 22.63,12.26 23.7,13.33 33.32,13.33 35.11,11.54 36.53,11.54 37.96,10.11 42.949,10.11 v1(44.439,8.62)
  Bottom Layer w0.27: U4.19@-17.545,16.707 -16.005,16.707 -15.998,16.714 -14.994,16.714 v1(-14.99,16.71)
  Bottom Layer w0.3: D24.1@-8.21,11.9 -8.18,11.93 v1(-8.18,12.566)
pads on no net: U1.6 U4.2 U4.3 U4.4 U4.25 U4.32 U4.33 U4.42 U4.43 U11.5 U11.9 U12.4

## Polygon pours and split planes (outlines as drawn)
PG on Bottom Layer "PG_L06_P114" (solid, pour order 114): 17 vertices, not listed, extent 5.16,8.02 11.327,22.71
CA on Bottom Layer "CA_L06_P119" (solid, pour order 119): 22 vertices, not listed, extent 12.63,6.61 22.59,12.6
CB on Bottom Layer "Bottom Layer-CB" (solid, pour order 71): 22 vertices, not listed, extent 24.949,6.629 35.079,12.632
GND on Bottom Layer "GND_L06_P111" (solid, pour order 111): 30 vertices, not listed, extent -21.85,2.9 4.12,32.16
V+ on Bottom Layer "Bottom Layer-V+" (solid, pour order 28): 21 vertices, not listed, extent 5.513,24.78 47.042,32.733
3V3 on Bottom Layer "3V3_L06_P108" (solid, pour order 108): -11,10.95 -11.2,10.75 -11.2,9.27 -10.57,8.64 -10.119,8.64 -9.854,8.905 -9.854,10.76 -10.044,10.95
GND on Bottom Layer "GND_L06_P106" (solid, pour order 106): 5.259,-0.941 4.368,-0.05 3.85,-0.05 3.47,-0.43 3.47,-1.57 3.77,-1.87 5.83,-1.87 6,-1.7 6,-1.48 5.461,-0.941
AGND on Bottom Layer "AGND_L06_P099" (solid, pour order 99): 2.29,14.74 3.71,14.74 5,13.45 5,3.93 4.33,3.26 -1.594,3.26 -2.114,2.74 -6.92,2.74 -7.44,3.26 -7.44,6.45 -7.44,7.89 -1.86,13.47 1.02,13.47 2.25,14.7
PG on Bottom Layer "Bottom Layer-PG" (solid, pour order 20): 36 vertices, not listed, extent 7.97,-1.086 38.56,9.51
V+ on Bottom Layer "Bottom Layer-V+ 1" (solid, pour order 86): 8.69,30.73 13.24,36.36 24.63,36.36 30.26,30.73
CC on Bottom Layer "Bottom Layer-CC" (solid, pour order 30): 55 vertices, not listed, extent 37,4.587 47.56,19.98
OUTC on Bottom Layer "Bottom Layer-OUTC" (solid, pour order 26): 17 vertices, not listed, extent 35.495,13.096 46.28,24.145
OUTB on Bottom Layer "Bottom Layer-OUTB" (solid, remove dead copper, pour order 24): 34.093,24.145 cw(c34.093,23.764) 34.474,23.764 34.474,13.731 cw(c33.447,14.044) 33.951,13.096 24.014,13.096 cw(c25.436,14.518) 23.425,14.518 23.425,19.664 cw(c25.965,19.664) 24.169,21.46 24.822,22.113 ccw(c24.209,22.726) 25.076,22.726 25.076,23.701 cw(c25.518,23.609) 25.266,23.983 cw(c25.724,23.424) 25.775,24.145
OUTA on Bottom Layer "Bottom Layer-OUTA" (solid, pour order 22): 21.642,24.145 cw(c21.642,23.764) 22.023,23.764 22.023,13.731 cw(c20.995,14.045) 21.5,13.096 11.563,13.096 cw(c12.985,14.518) 10.974,14.518 10.974,19.664 cw(c13.514,19.664) 11.718,21.46 12.371,22.113 ccw(c11.758,22.726) 12.625,22.726 12.625,23.711 cw(c13.059,23.711) 12.752,24.018 cw(c13.059,23.711) 13.059,24.145
CA on Top Layer "CA_L01_P135" (solid, pour order 135): 19.91,11.55 22,11.55 22.34,11.21 22.34,9.98 21.16,8.8 21.16,6.89 20.96,6.69 17.5,6.69 17.23,6.96 17.23,8.96 18.35,10.08
CB on Top Layer "CB_L01_P134" (solid, pour order 134): 25 vertices, not listed, extent 26.38,7.08 34.51,12.55
CC on Top Layer "CC_L01_P133" (solid, pour order 133): 20 vertices, not listed, extent 38.77,4.28 46.67,9.6
OUTA on Top Layer "OUTA_L01_P132" (solid, pour order 132): 21 vertices, not listed, extent 16.64,14.71 22.08,22.93
OUTB on Top Layer "OUTB_L01_P131" (solid, pour order 131): 26 vertices, not listed, extent 29.35,13.6 33.84,22.04
OUTC on Top Layer "OUTC_L01_P130" (solid, pour order 130): 42.96,22.19 45.17,22.19 47.1,20.26 47.1,14.8 46.06,13.76 41.46,13.76 41.46,15.66 42.55,15.66 43.11,16.22 43.11,16.73 42.07,17.77 42.07,19.53 41.57,20.03 41.57,21.48 42.24,22.15
PG on Top Layer "PG_L01_P122" (solid, pour order 122): 43 vertices, not listed, extent 5.65,-1.57 38.31,10.048
GND on Top Layer "GND_L01_P110" (solid, pour order 110): 30 vertices, not listed, extent -21.85,2.9 4.12,32.16
GND on Top Layer "GND_L01_P107" (solid, pour order 107): 3.48,1.98 3.48,-1.58 3.99,-2.09 5.94,-2.09 6.31,-1.72 6.31,-1.02 5.13,0.16 5.13,2.55 3.19,4.49 1.949,4.49 1.459,4.001 1.631,3.829
AGND on Top Layer "AGND_L01_P104" (solid, pour order 104): 0.94,16.88 2.86,14.96 3.51,14.96 4.44,14.03 4.44,13.37 3.41,12.34 3.41,5.49 1.55,3.63 -1.14,3.63 -1.95,2.82 -6.01,2.82 -7.38,4.19 -7.38,7.91 0.57,15.86 0.57,16.91
V+ on Top Layer "V+_L01_P102" (solid, pour order 102): 67 vertices, not listed, extent 5.04,24.39 47.58,34.18
V+ on Top Layer "Top Layer-V+ 1" (solid, pour order 88): 6.45,28.86 13.88,36.29 24.21,36.29 31.64,28.86
PG on Top Layer "Top Layer-PG 1" (solid, pour order 36): 19 vertices, not listed, extent 4.11,17.99 8.66,23.836
PG on S1 "PG_L03_P103" (solid, pour order 103): 36 vertices, not listed, extent 3.76,-1.6 38.03,22.85
CA on S1 "CA_L03_P121" (solid, pour order 121): 17.27,6.69 17.82,6.14 21.11,6.14 21.72,6.75 21.72,9.242 22.091,9.614 17.574,9.614 17.27,9.31
CC on S1 "S1-CC" (solid, pour order 76): 28 vertices, not listed, extent 37.06,4.57 47.43,12.31
CA on S1 "CA_L03_P118" (solid, pour order 118): 21 vertices, not listed, extent 12.47,8.22 22.493,12.62
CB on S1 "CB_L03_P116" (solid, pour order 116): 24 vertices, not listed, extent 26.25,6.97 34.5,12.6
GND on S1 "GND_L03_P113" (solid, pour order 113): 28 vertices, not listed, extent -21.77,-1.8 6.9,32.17
V+ on S1 "S1-V+" (solid, pour order 98): 22 vertices, not listed, extent 5.32,12.7 47.27,36.28
OUTC on S1 "S1-OUTC" (solid, pour order 66): 37.436,24.217 45.956,24.217 cw(c45.956,23.637) 46.366,24.047 cw(c46.028,23.709) 46.506,23.709 46.506,14.026 cw(c45.857,14.026) 46.316,13.567 46.044,13.295 cw(c45.856,13.483) 45.856,13.217 36.006,13.217 cw(c36.006,13.627) 35.716,13.337 cw(c36.32,13.941) 35.466,13.941 35.466,22.308 cw(c37.515,22.308) 36.066,23.757 cw(c37.225,22.598) 37.225,24.237 37.436,24.237
OUTB on S1 "S1-OUTB" (solid, pour order 64): 25.65,24.217 34.17,24.217 cw(c34.17,23.637) 34.58,24.047 cw(c34.242,23.709) 34.72,23.709 34.72,14.026 cw(c34.071,14.026) 34.53,13.567 34.258,13.295 cw(c34.07,13.483) 34.07,13.217 24.22,13.217 cw(c24.22,13.627) 23.93,13.337 cw(c24.534,13.941) 23.68,13.941 23.68,22.308 cw(c25.729,22.308) 24.28,23.757 cw(c25.439,22.598) 25.439,24.237 25.65,24.237
OUTA on S1 "S1-OUTA" (solid, pour order 62): 12.95,24.09 21.47,24.09 cw(c21.47,23.51) 21.88,23.92 cw(c21.542,23.582) 22.02,23.582 22.02,13.899 cw(c21.371,13.899) 21.83,13.44 21.558,13.168 cw(c21.37,13.356) 21.37,13.09 11.52,13.09 cw(c11.52,13.5) 11.23,13.21 cw(c11.834,13.814) 10.98,13.814 10.98,22.181 cw(c13.029,22.181) 11.58,23.63 cw(c12.739,22.471) 12.739,24.11 12.95,24.11
OUTA on S2 "OUTA_L04_P129" (solid, pour order 129): 13.785,23.395 20.665,23.395 21.86,22.2 21.86,19.73 21.165,19.035 20.865,19.035 20.315,18.485 13.375,18.485 12.985,18.875 12.985,20.905 13.455,21.375 13.455,23.065
PG on S2 "PG_L04_P128" (solid, pour order 128): 5.53,22.55 7.48,22.55 8.98,21.05 8.98,19.71 8.43,19.16 5.1,19.16 4.42,19.84 4.42,21.44
PG on S2 "PG_L04_P127" (solid, pour order 127): 17 vertices, not listed, extent 8.18,-1.57 37.98,6.75
OUTC on S2 "OUTC_L04_P126" (solid, pour order 126): 42.67,22.35 45.06,22.35 46.78,20.63 46.78,14.36 45.95,13.53 45.9,13.58 36.249,13.58 35.85,13.979 35.85,15.53
OUTB on S2 "OUTB_L04_P125" (solid, pour order 125): 24.33,16.16 33.51,16.16 34.32,15.35 34.32,14.1 33.98,13.76 24.15,13.76 23.54,14.37 23.54,15.37
OUTA on S2 "OUTA_L04_P124" (solid, pour order 124): 12.21,16.18 21.39,16.18 22.02,15.55 22.02,14.5 21.61,14.09 18.65,14.09 18.38,14.36 11.89,14.36 11.54,14.71 11.54,15.51
V+ on S2 "V+_L04_P123" (solid, pour order 123): 17 vertices, not listed, extent 5.52,24.88 46.83,36.18
CC on S2 "S1-CC" (solid, pour order 120): 25 vertices, not listed, extent 37.06,4.57 47.43,12.31
CA on S2 "CA_L04_P117" (solid, pour order 117): 21 vertices, not listed, extent 12.47,8.22 22.493,12.62
CB on S2 "CB_L04_P115" (solid, pour order 115): 24 vertices, not listed, extent 26.25,6.97 34.5,12.6
GND on S2 "GND_L04_P105" (solid, remove dead copper, pour order 105): 28 vertices, not listed, extent -21.77,-1.8 6.9,32.17
AGND on G1 (split plane): 57 vertices, not listed, extent -7.538,-1.791 7.038,15.318
PG on G1 (split plane): 118 vertices, not listed, extent 5.882,-1.791 47.24,9.618
GND on G1 (split plane): 168 vertices, not listed, extent -21.841,2.709 4.878,36.291
V+ on G1 (split plane): 100 vertices, not listed, extent 5.882,10.622 47.24,36.291
no net on G1 (split plane): 47.04,4.46
OUTC on G1 (split plane): 47.24,10.622 37.399,10.622 37.398,10.623 37.3,10.632 35.998,10.632 36.002,10.68 36.002,23.058 47.24,23.058
OUTA on G1 (split plane): 22.238,10.622 13.962,10.622 13.962,18.802 18.218,23.058 22.238,23.058
OUTB on G1 (split plane): 34.998,10.68 35.003,10.622 23.242,10.622 23.242,23.058 34.998,23.058
GND on G2 (split plane): 210 vertices, not listed, extent -21.841,-1.791 7.078,36.291
V+ on G2 (split plane): 97 vertices, not listed, extent 5.882,10.482 47.24,36.291
PG on G2 (split plane): 131 vertices, not listed, extent 5.882,-1.791 47.24,9.478
OUTB on G2 (split plane): 35.928,10.512 35.21,10.512 35.112,10.503 35.045,10.482 24.862,10.482 24.862,23.058 35.928,23.058
no net on G2 (split plane): 47.04,4.46
OUTA on G2 (split plane): 23.858,10.482 11.172,10.482 11.172,22.702 11.528,23.058 23.858,23.058
OUTC on G2 (split plane): 47.24,10.482 36.932,10.482 36.932,23.058 47.24,23.058

## Other copper
Top Layer:
  rectangle net GND: 24.02,20.245 25.11,21.56
  region net 3V3: -16.155,9.57 cw(c-15.655,9.523) -15.975,9.91 cw(c-15.565,9.5) -15.565,10.08 -13.567,10.08 ccw(c-13.567,12.62) -11.771,10.824 -11.745,10.85 cw(c-11.166,10.271) -11.166,11.09 -10.321,11.09 cw(c-10.321,10.715) -10.055,10.98 -9.969,10.894 cw(c-10.122,10.74) -9.905,10.74 -9.905,9.063 cw(c-10.178,9.063) -9.985,8.87 cw(c-10.323,9.208) -10.323,8.73 -10.49,8.73 cw(c-10.49,9.106) -10.755,8.84 ccw(c-11.069,8.526) -11.069,8.97 -14.775,8.97 ccw(c-14.775,8.39) -15.185,8.8 ccw(c-14.606,8.221) -15.425,8.221 -15.425,7.915 cw(c-16.04,7.915) -15.605,7.48 -15.804,7.281 cw(c-15.89,7.366) -15.89,7.246 -16.024,7.246 cw(c-16.024,7.432) -16.155,7.3 cw(c-15.914,7.542) -16.255,7.542 -16.255,7.945 cw(c-16.05,7.945) -16.195,8.09 ccw(c-16.292,8.187) -16.155,8.187 -16.155,8.944
  region net 3V3: -13.6,28.55 -13.75,28.7 -14.56,28.7 -14.86,28.4 -14.86,27.24 -14.52,26.9 -13.94,26.9 -13.6,27.24
S1:
  rectangle net CC: 38.596,6.929 40.44,7.315
S2:
  rectangle net GND: -1.23,22.73 2.12,25.14
Bottom Layer:
  rectangle net CC: 38.88,6.71 40.445,7.704
  region net 3V3: -13.2,28.29 -13.61,28.7 -14.56,28.7 -14.86,28.4 -14.86,27.24 -14.52,26.9 -13.85,26.9 -13.85,27.465 -13.4,27.78
  region net NetC13_1: -7.7,27.85 -7.7,25.44 -7.98,25.16 -7.98,22.98 -8.21,22.75 -9.42,22.75 -9.91,23.24 -9.91,25.47 -9.38,26 -9.38,27.33 -8.86,27.85
  region net NetC16_1: -4.71,20.95 -4.71,23.49 -3.8,24.4 -3.8,25.36 -7.01,25.36 -7.31,25.06 -7.31,21.91 -6.35,20.95
  region net NetC1_1: -1.27,21.99 -2.9,23.62 -3.69,23.62 -3.69,21.1 -2.88,20.29 -1.49,20.29 -1.27,20.51
G1 (plane layer: these items are gaps in the copper):
  rectangle: -13.94,31.25 -13.87,31.51
  rectangle: 3.17,15.93 3.87,17.17
  lines w1: -8.04,2.21 -8.04,8.44 -0.66,15.82 5.38,15.82 ; 5.37,10.12 13.46,10.12 ; 5.38,10.12 5.38,7.64 ; 5.38,36.8 5.38,7.64 ; 7.54,-2.11 7.54,5.48 ; 22.74,10.28 22.74,23.55 ; 33.65,6.71 33.65,8.44 35.34,10.13 37.3,10.13 ; 35.5,10.68 35.5,23.55 ; 47.62,10.12 13.46,10.12 ; 47.8,23.56 18.01,23.56 13.46,19.01 13.46,10.12 ; 5.38,7.64 7.54,5.48 ; 5.38,7.64 7.54,5.48
G2 (plane layer: these items are gaps in the copper):
  rectangle: -1.81,14.55 -1.02,15.43
  rectangle: -13.96,31.17 -13.8,31.6
  lines w1: 5.38,36.55 5.38,7.85 7.58,5.65 ; 5.39,7.13 6.54,7.13 ; 5.42,9.98 47.39,9.98 ; 5.47,7.76 7.58,5.65 ; 7.58,-2.12 7.58,5.65 ; 10.67,10.24 10.67,22.91 11.32,23.56 47.59,23.56 ; 24.36,10.18 24.36,23.46 ; 33.65,6.71 33.65,8.45 35.21,10.01 36.35,10.01 ; 36.43,10.37 36.43,23.5

## Silkscreen, mask and mechanical layers (free items; w line width, h text height)
Top Overlay:
  circle w0.254: c31,0 r3
  circle w0.254: c0,0 r3
  circle w0.254: c0,34.5 r3
  circle w0.254: c31,34.5 r3
  lines w0.15: 2.58,32.06 3.48,32.96 3.48,36.32 9.31,36.32 9.31,33.11 3.48,33.11 ; 5,33.11 5,36.26 ; 6.42,33.13 6.42,36.28 ; 7.84,33.14 7.84,36.29
  lines w0.254: -7.467,2.963 -7.69,2.74 -13.7,2.74 -13.7,4.51 -7.745,4.51 -7.441,4.206
  text "VCC" at 4.74,33.43 h0.9 r90
  text "SWD" at 6.163,33.43 h0.9 r90
  text "SWC" at 7.587,33.43 h0.9 r90
  text "GND" at 9.01,33.43 h0.9 r90
  text "H" at -19.252,27.701 h0.9
  text "L" at -19.252,25.701 h0.9
  text "PWM" at -19.26,23.63 h0.9
  text "GND" at -19.252,21.701 h0.9
  text "12V" at -19.252,19.701 h0.9
  text "GND" at -19.252,17.701 h0.9
  text "HA" at -19.252,15.701 h0.9
  text "HB" at -19.252,13.701 h0.9
  text "HC" at -19.252,11.701 h0.9
  text "电机温度" at -13.42,2.95 h1.5
Top Solder:
  rectangle: 11.69,27.49 45.1,31.33
  rectangle: 12.55,2.81 38.23,6.28
  lines w1.5: 10.43,31.62 12.21,33.4 25.11,33.4 ; 11.22,2.3 12.51,1.01 26.28,1.01
Bottom Solder:
  lines w1.5: 11.33,31.12 44.25,31.12 ; 12.06,1.37 26.06,1.37 ; 12.29,33.7 25.93,33.7 ; 13.21,4.31 33.73,4.31
Mechanical 1:
  lines w0.013: -15.3,4.382 cw(c-16.3,2.649) -14.34,3.05
  lines w0.1: -14.341,3.051 ccw(c-16.3,2.642) -16.3,4.644 -21.3,4.644 cw(c-21.3,5.644) -22.3,5.644 -22.3,28.86 cw(c-21.3,28.86) -21.3,29.86 -16.3,29.86 ccw(c-16.3,31.861) -14.341,31.453 cw(c-13.363,31.251) -13.362,32.25 -5.5,32.25 ; -14.34,3.05 ccw(c-13.362,3.248) -13.36,2.25 -5.5,2.25 cw(c-5.5,1.25) -4.5,1.25 -4.5,-0.25 ccw(c-2.5,-0.25) -2.5,-2.25 31.5,-2.25 ccw(c31.5,-0.25) 33.5,-0.25 33.5,1.25 cw(c34.5,1.25) 34.5,2.25 45.76,2.25 ccw(c45.762,3.248) 46.74,3.05 cw(c48.7,2.649) 47.416,4.183 ; -5.5,32.25 ccw(c-5.5,33.25) -4.5,33.25 -4.5,34.75 cw(c-2.5,34.75) -2.5,36.75 31.5,36.75 cw(c31.5,34.75) 33.5,34.75 33.5,33.25 ccw(c34.5,33.25) 34.5,32.25 45.762,32.25 cw(c45.763,31.251) 46.741,31.453 ccw(c48.7,31.861) 47.328,30.405 cw(c46.7,29.628) 47.699,29.628 47.7,4.88 cw(c46.7,4.88) 47.328,4.103
Mechanical 2:
  lines w0.1: -27.3,17.25 49.57,17.25